# Altium PCB DB30.PcbDoc (part 2 of 8)
Units mil, origin at the board's own origin, x right, y up, seen from the top; angles counter-clockwise.
Board outline 3236.22 x 4456.69 mil, 8 copper layers (Top Layer, MidLayer1, MidLayer2, GND-Layer5, MidLayer3, VCC, MidLayer4, Bottom Layer), stack 61.8 mil thick; 219 components, 472 nets, 1811 pads, 1561 vias.
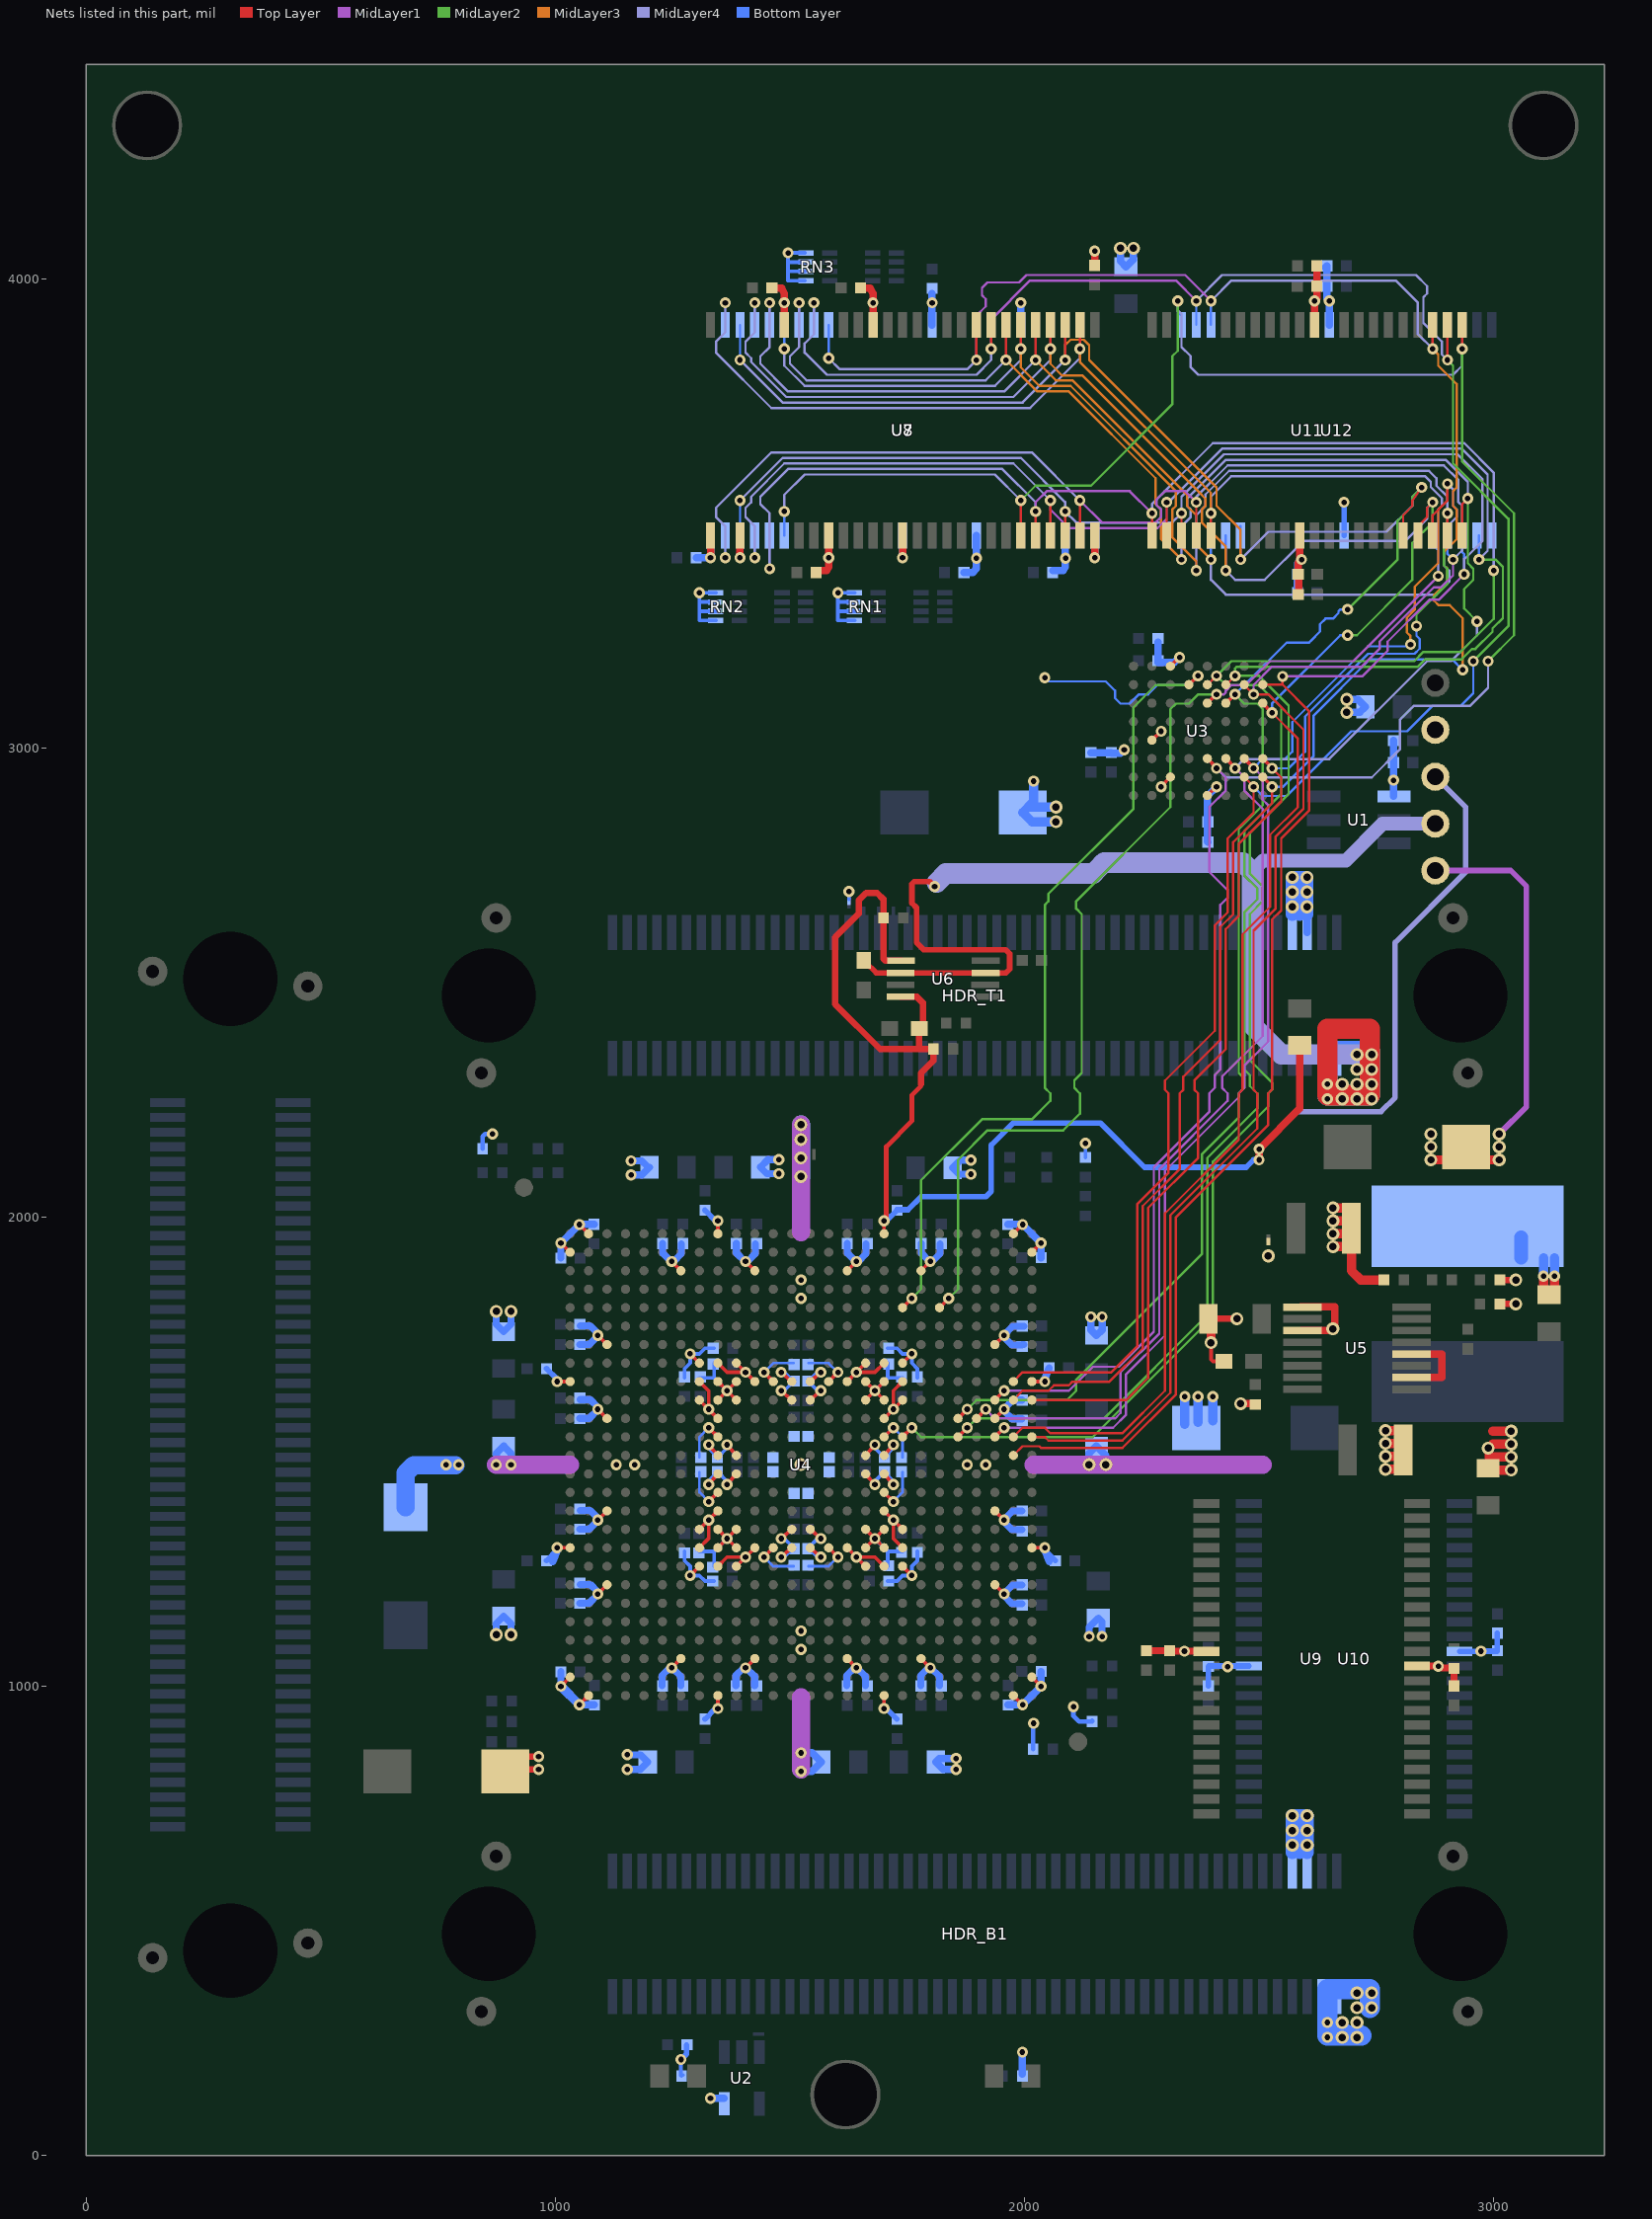
[diagram p8: the nets of this part, all layers, seen from the top]

## Part data
"Altium Logo Bot1" "Altium Logo Top1": library part D-000-0003, "Altium Logo for PCB"
C1 C7 C8 C9 C10 C11 C12 C13 C14 C26 C27 C28 C29 C30 C50 C51 C52 C53 C54 C55 C56 C57 C58 C59 C60 C61 C62 C63 C64 C65 C108 C109 C110 C114 C128 C129 C130 C131 C136 C137 C140 C141 C144 C145 C146 C147: library part D-101-0080, "Capacitor, Ceramic, 0.1uF 10% 16V 0402 (1005) X7R"
C2 C15 C16 C17 C18 C19 C20 C21 C22 C31 C32 C33 C34 C35 C36 C37 C38 C39 C40 C41 C66 C67 C68 C69 C70 C71 C72 C73 C74 C75 C76 C77 C78 C79 C80 C81 C82 C83 C84 C85 C86 C87 C88 C89 C90 C91 C92 C93 C94 C95 C96 C97 C98 C99 C100 C101 C102 C103 C104 C105 C111 C112 C113 C132 C133 C134 C135 C138 C139 C142 C143 C148 C149 C150 C151: library part D-101-0077, "Capacitor, Ceramic, 10nF 10% 16V 0402 (1005) X7R"
C3 C23 C106 C107 C119: library part D-101-0088, "Capacitor, Tantalum, 220uF 10% 10V MCCT-D (7343-31)"
C4 C5 C6 C24 C25 C42 C43 C44 C45 C46 C47 C48 C49 C115 C116 C120 C122: library part D-101-0087, "Capacitor, Ceramic, 10uF 10% 10V 0805 (2012) X5R"
C117: library part D-101-0069, "Capacitor, Ceramic, 470pF 5% 50V 0402 (1005) COG"
C118 C125 C126: library part D-101-0095, "Capacitor, Ceramic, 2.2uF 10% 10V 0603 (1608) X5R"
C121 C123: library part D-101-0021, "Capacitor, Ceramic, 22uF -20%/+80% 10V 1210 (3225) Y5V"
C124: library part D-101-0027, "Capacitor, Ceramic, 1uF 10% 25V 1206 (3216) X7R"
C127: library part D-101-0105, "Capacitor, Ceramic, 0.033uF 10% 10V 0402 (1005) X7R"
HDR_B1 HDR_L1 HDR_T1: library part D-300-0025, "Connector, Molex Docking Station 100 Pin Male 54075"
L1: library part D-102-0004, "Inductor, 2.2uH, 15A, 4R2, SMD"
LED1: library part D-153-0004, "LED, Green 0805 (2012) KP-2012SGD"
LED2: library part D-153-0003, "LED, Red 0805 (2013) HSMH-C170"
MH1 MH2 MH3: library part D-001-0001, "Mounting Hole, M3 Screw, Plated, Square Pad"
NT1 NT2 NT3 NT4 NT5 NT6 NT7 NT8: library part D-002-0002, "Net-Tie, Surface Mount, 2 x 0.4mm x 0.2mm SMT Pads - For 0.2mm Track"
R1 R2: library part D-100-0111, "Resistor, 270R 1% 0402 (1005)"
R3 R5 R9 R12: library part D-100-0088, "Resistor, 4K7 1% 0402 (1005)"
R4 R6 R7 R8 R10 R11 R13 R14 R15 R16 R17: library part D-100-0131, "Resistor, 100R 1% 0402 (1005)"
R18 R23 R24 R25: library part D-100-0132, "Resistor, 100K 1% 0402 (1005)"
R19: library part D-100-0128, "Resistor, 10R 1% 0402 (1005)"
R20 R22: library part D-100-0105, "Resistor, 2K7 1% 0402 (1005)"
R21: library part D-100-0109, "Resistor, 27K 1% 0402 (1005)"
RN1 RN2 RN3 RN4 RN5 RN6: library part D-104-0001, "Resistor Network, Isolated, 4 x 100R, 5%, SMD 0402 x 4"
TP1 TP2 TP3 TP4 TP5: library part D-006-0000, "Test Point, PCB Mount with Silkscreen Box"
U1: library part D-263-0002, "Dual Addressable Switch Plus 1KB Memory"
U2: library part D-205-0001, "SN74LVC1G04DBV, Single Inverter Gate, 1.65-V to 5.5-V"
U3: library part D-262-0001, "S29GL256N11FFIV10, 256 Megabit (16M x 16) 3.0V Page Mode Flash Memory"
U4: library part D-241-0001, "FPGA, Xilinx Spartan3-1500 FG676 Speed=4"
U5: library part D-204-0002, "MAX1831EEE, 3A, 1MHz, Low-Voltage, Step-Down Regulators with Synchronous Rectification and Internal Switches"
U6: library part D-204-0016, "MAX8860EUA18+, 1.8V Linear Regulator with adjustable Output, Low-noise, Low-dropout, 300mA, uMAX"
U7 U8: library part D-261-0000, "MT48LC16M16A2TG, 256 Mbit High-Speed CMOS SDRAM, 16Mb x 16Bit x 4 Banks, TSOP54"
U9 U10 U11 U12: library part D-260-0000, "K6R4016V1D-TC10T, 256K x 16-Bit SRAM, TSOP44"

## Via types
v1: diameter 23.62, hole 11.81, Top Layer to Bottom Layer, 944 vias
v2: diameter 23.62, hole 11.81, Top Layer to Bottom Layer, tented both sides, 477 vias
v3: diameter 27.56, hole 15.75, Top Layer to Bottom Layer, 139 vias
v4: diameter 23.62, hole 11.81, Top Layer to Bottom Layer, tented top, 1 vias

## Nets (pads, with @x,y where several pads share a name; then routed paths per layer and width w, separated by ;. In a path a pad name is that pad's centre, name@x,y a point inside that pad or via, vN(x,y) a via of type N, cw(c..) or ccw(c..) an arc to the next point about the centre after c; other vN are vias at no path point)
1V2: C3.1 C4.1 C5.1 C6.1 C7.1 C8.1 C9.1 C10.1 C11.1 C12.1 C13.1 C14.1 C15.1 C16.1 C17.1 C18.1 C19.1 C20.1 C21.1 C22.1 C119.1 C122.1 C123.1 L1.2 R20.1 TP5.1 U4.H8 U4.H19 U4.J9 U4.J10 U4.J17 U4.J18 U4.K9 U4.K10 U4.K17 U4.K18 U4.U9 U4.U10 U4.U17 U4.U18 U4.V9 U4.V10 U4.V17 U4.V18 U4.W8 U4.W19 | length 4494.8
  Top Layer w7.87: v1(1287.4,1236.22) U4.W8@1307.09,1255.91 ; v1(1287.4,1708.66) U4.H8@1307.09,1688.98 ; U4.V9@1346.46,1295.28 v1(1366.14,1314.96) ; U4.U9@1346.46,1334.65 v1(1366.14,1314.96) ; U4.K9@1346.46,1610.24 v1(1366.14,1629.92) ; U4.J9@1346.46,1649.61 v1(1366.14,1629.92) ; U4.V10@1385.83,1295.28 v1(1366.14,1314.96) ; U4.U10@1385.83,1334.65 v1(1366.14,1314.96) ; U4.K10@1385.83,1610.24 v1(1366.14,1629.92) ; U4.J10@1385.83,1649.61 v1(1366.14,1629.92) ; U4.V17@1661.42,1295.28 v1(1681.1,1314.96) ; U4.U17@1661.42,1334.65 v1(1681.1,1314.96) ; U4.K17@1661.42,1610.24 v1(1681.1,1629.92) ; U4.J17@1661.42,1649.61 v1(1681.1,1629.92) ; U4.V18@1700.79,1295.28 v1(1681.1,1314.96) ; U4.U18@1700.79,1334.65 v1(1681.1,1314.96) ; U4.K18@1700.79,1610.24 v1(1681.1,1629.92) ; U4.J18@1700.79,1649.61 v1(1681.1,1629.92) ; U4.W19@1740.16,1255.91 v1(1759.84,1236.22) ; U4.H19@1740.16,1688.98 v1(1759.84,1708.66)
  Top Layer w19.68: C123.1@2694.88,1974.41 2692.91,1976.37 C123.1@2704.72,1988.19 ; C123.1@2696.85,1948.82 2696.85,1976.37 2696.85,1885.83 2716.54,1866.14 R20.1@2766.21,1866.14 ; v3(2866.14,2122.05) C119.1@2913.39,2122.05 ; C119.1@2941.3,2122.05 v3(3011.81,2122.05) ; C119.1@2941.3,2149.61 C119.1@2941.02,2149.33 C119.1@2968.3,2122.05 ; C122.1@3106.3,1834.65 v1(3106.3,1874.02) ; C122.1@3129.92,1834.65 v1(3129.92,1874.02)
  Top Layer w20: v3(2657.47,1937) C123.1@2696.85,1937 ; v3(2657.47,1964.56) C123.1@2696.85,1964.56 ; v3(2657.47,1992.12) C123.1@2696.85,1992.12 ; v3(2657.47,2019.68) C123.1@2696.85,2019.68
  MidLayer1 w12: TP5.1@2875.71,2738.67 3036.33,2738.67 3070,2705 3070,2235.35 v3(3011.81,2177.17)
  MidLayer1 w39.37: v1(874.02,1472.44) 1031.5,1472.44 ; v1@1523.62,822.83 1523.62,976.38 ; 1523.62,1968.5 v3(1523.62,2196.85) ; 2019.68,1472.44 v3(2137.8,1472.44) 2507.87,1472.44
  Bottom Layer w7.87: C19.1@1275.59,1287.4 1275.59,1267.72 1287.4,1255.91 v1(1287.4,1236.22) 1307.09,1236.22 1318.9,1224.41 C20.1@1338.58,1224.41 ; C13.1@1275.59,1657.48 1275.59,1677.17 1287.4,1688.98 v1(1287.4,1708.66) 1307.09,1708.66 1318.9,1720.47 C18.1@1338.58,1720.47 ; C11.1@1307.08,1287.4 1338.58,1287.4 ; C22.1@1307.09,1657.48 1338.58,1657.48 ; C9.1@1338.58,1255.9 1338.58,1287.4 ; C14.1@1338.58,1688.98 1338.58,1657.48 ; v1(1366.14,1314.96) 1338.58,1287.4 ; v1(1366.14,1629.92) 1338.58,1657.48 ; v1(1681.1,1314.96) 1708.66,1287.4 ; v1(1681.1,1629.92) 1708.66,1657.48 ; C15.1@1708.66,1224.41 1728.35,1224.41 1740.16,1236.22 v1(1759.84,1236.22) 1759.84,1255.9 1771.65,1267.72 C8.1@1771.65,1287.4 ; C7.1@1708.66,1255.9 1708.66,1287.4 ; C12.1@1708.66,1688.98 1708.66,1657.48 ; C21.1@1708.66,1720.47 1728.35,1720.47 1740.16,1708.66 v1(1759.84,1708.66) 1759.84,1688.98 1771.65,1677.17 C10.1@1771.65,1657.48 ; C16.1@1740.16,1287.4 1708.66,1287.4 ; C17.1@1740.16,1657.48 1708.66,1657.48
  Bottom Layer w15.75: v1(874.02,1472.44) 874.02,1496.06 C4.1@889.76,1511.81 905.51,1496.06 v1(905.51,1472.44) ; v1(1523.62,818.9) 1547.24,818.9 C5.1@1566.93,838.58 1547.24,858.27 v1(1523.62,858.27) ; v3(2137.8,1472.44) 2137.8,1496.06 C6.1@2153.54,1511.81 2173.23,1492.12 v3(2173.23,1472.44)
  Bottom Layer w19.68: v1(3106.3,1874.02) L1.2@3106.3,1913.39 ; v1(3129.92,1874.02) L1.2@3129.92,1913.39
  Bottom Layer w20: C3.1@2341.79,1558.51 v1(2341.79,1617.56) ; C3.1@2370.08,1562.45 v1(2370.08,1617.56) ; C3.1@2401.58,1566.38 v1(2401.58,1617.56)
  Bottom Layer w29.53: L1.2@3059.06,1913.38 L1.2@3059.06,1956.69
  Bottom Layer w39.37: v3(1523.62,2086.61) v3(1523.62,2196.85)
  other v1: 1523.62,1078.74 1523.62,1118.11 1129.92,1472.44 1169.29,1472.44 1877.95,1472.44 1917.32,1472.44 1523.62,1826.77 1523.62,1866.14
  other v3: 1523.62,2125.98 2866.14,2149.61 3011.81,2149.61 1523.62,2165.35 2866.14,2177.17
2V5: C23.1 C24.1 C25.1 C26.1 C27.1 C28.1 C29.1 C30.1 C31.1 C32.1 C33.1 C34.1 C35.1 C36.1 C37.1 C38.1 C39.1 C40.1 C41.1 C125.1 R18.2 R24.1 TP3.1 U4.A2 U4.A9 U4.A18 U4.A25 U4.AE1 U4.AE26 U4.AF2 U4.AF9 U4.AF18 U4.AF25 U4.B1 U4.B26 U4.J1 U4.J26 U4.V1 U4.V26 U6.1 U6.4 | length 5138.7
  Top Layer w5: 1779.53,2279.53 1779.53,2283.46
  Top Layer w7.87: v1(1003.94,1295.28) U4.V1@1031.5,1295.28 ; v1(1003.94,1649.61) U4.J1@1031.5,1649.61 ; v1(1011.81,1000) U4.AE1@1031.5,1019.68 ; v1(1011.81,1944.88) U4.B1@1031.5,1925.2 ; v1(1051.18,960.63) U4.AF2@1070.87,980.31 ; v1(1051.18,1984.25) U4.A2@1070.87,1964.57 ; v1(1346.46,952.76) U4.AF9@1346.46,980.31 ; U4.A9@1346.46,1964.57 v1(1346.46,1992.13) ; v1(1700.79,952.76) U4.AF18@1700.79,980.31 ; U4.A18@1700.79,1964.57 v1(1700.79,1992.13) ; U4.AF25@1976.38,980.31 v1(1996.06,960.63) ; U4.A25@1976.38,1964.57 v1(1996.06,1984.25) ; U4.AE26@2015.75,1019.68 v1(2035.43,1000) ; U4.V26@2015.75,1295.28 v1(2043.31,1295.28) ; U4.J26@2015.75,1649.61 v1(2043.31,1649.61) ; U4.B26@2015.75,1925.2 v1(2035.43,1944.88)
  Top Layer w10: v1(1700.79,1992.13) 1705.41,1996.75 1705.41,2150.3 1759.84,2204.72 1759.84,2236.22 1759.84,2259.84 1779.53,2279.53
  Top Layer w13.78: C23.1@893.78,818.62 925.55,850.39 v1(964.57,850.39) ; C23.1@897.99,822.83 v1(964.57,822.83) ; U6.4@1736.22,2469.48 1770.67,2469.48 1783.46,2456.69 1783.46,2413.39 C125.1@1775.59,2405.51 ; U6.1@1737.2,2546.25 1703.75,2546.25 1699.29,2550.71 R24.1@1699.29,2637.79 1699.29,2677.68 1686.02,2690.94 1662.4,2690.94 1646.65,2675.2 1646.65,2646.65 1596.46,2596.46 1596.46,2453.74 1691.93,2358.26 R18.2@1805.59,2358.26 ; 1775.59,2358.27 C125.1@1775.59,2401.57 ; 1779.53,2283.46 1779.53,2307.09 1795.28,2322.83 1805.59,2333.15 R18.2@1805.59,2354.33
  Top Layer w15.75: v1@2500,2125.97 v1(2500,2145) 2586.61,2231.61 2586.61,2267.72 C24.1@2586.61,2366.14
  MidLayer4 w11.81: v1(2500,2122.05) v1(2500,2145) 2580,2225 2760,2225 2790,2255 2790,2585 2940,2735 2940,2874.37 TP3.1@2875.71,2938.67
  Bottom Layer w7.87: v1@1341.53,1992.13 v1(1346.46,1992.13)
  Bottom Layer w11.81: C28.1@981.3,1267.71 1003.94,1290.35 v1(1003.94,1295.28) ; C32.1@981.3,1677.16 1003.94,1654.52 v1(1003.94,1649.61) ; C40.1@1318.89,930.12 1341.53,952.76 v1(1346.46,952.76) ; C29.1@1318.89,2014.76 v1@1341.53,1992.13 ; v1(1700.79,952.76) 1705.7,952.76 C30.1@1728.34,930.12 ; v1(1700.79,1992.13) 1705.71,1992.13 C26.1@1728.34,2014.76 ; C26.1@1728.34,2015.74 1751.97,2015.74 1779.52,2043.3 1917.32,2043.3 1929.13,2055.11 1929.13,2153.54 1976.37,2200.78 2161.41,2200.78 2255.9,2106.29 2472.44,2106.29 2488.18,2122.04 v1(2500,2122.05) ; v1(2043.31,1295.28) 2043.31,1290.35 C39.1@2065.94,1267.71
  Bottom Layer w15.75: 994.63,1266.18 v1@1003.94,1290.35 ; v1(1011.81,1000) 1011.81,1030.92 C35.1@1011.81,1031.49 ; C41.1@1011.81,1913.39 v1(1011.81,1944.88) v1(1051.18,1984.25) 1082.1,1984.25 C33.1@1082.68,1984.25 ; v1(1051.18,960.63) C38.1@1082.68,960.63 ; v1(1476.26,2092.6) 1450.71,2092.6 C25.1@1437.01,2106.29 1453.31,2122.6 v1(1476.26,2122.6) ; C31.1@1964.57,960.63 1965.14,960.63 v1(1996.06,960.63) v1(2035.43,1000) C36.1@2035.43,1031.5 ; C34.1@1964.57,1984.25 v1(1996.06,1984.25) v1(2035.43,1944.88) 2035.43,1913.96 C37.1@2035.43,1913.39 ; v1@2042.32,1650.59 v1(2043.31,1649.61) 2043.31,1654.53 C27.1@2052.62,1678.7 ; v1@2043.31,1290.35 2052.62,1266.18
  Bottom Layer w19.68: v1(1011.81,1000) v1(1051.18,960.63)
3V3: C1.2 C2.1 C42.1 C43.1 C44.1 C45.1 C46.1 C47.1 C48.1 C49.1 C50.1 C51.1 C52.1 C53.1 C54.1 C55.1 C56.1 C57.1 C58.1 C59.1 C60.1 C61.1 C62.1 C63.1 C64.1 C65.1 C66.1 C67.1 C68.1 C69.1 C70.1 C71.1 C72.1 C73.1 C74.1 C75.1 C76.1 C77.1 C78.1 C79.1 C80.1 C81.1 C82.1 C83.1 C84.1 C85.1 C86.1 C87.1 C88.1 C89.1 C90.1 C91.1 C92.1 C93.1 C94.1 C95.1 C96.1 C97.1 C98.1 C99.1 C100.1 C101.1 C102.1 C103.1 C104.1 C105.1 C106.1 C107.1 C108.2 C109.1 C110.1 C111.1 C112.1 C113.1 C114.1 C115.1 C116.1 C128.1 C129.1 C130.1 C131.1 C132.1 C133.1 C134.1 C135.1 C136.1 C137.1 C138.1 C139.1 C140.1 C141.1 C142.1 C143.1 C144.1 C145.1 C146.1 C147.1 C148.1 C149.1 C150.1 C151.1 HDR_B1.94 HDR_B1.96 HDR_T1.94 HDR_T1.96 NT1.2 R1.1 R2.1 R3.2 R5.2 R9.2 R12.2 RN1.1 RN1.2 RN1.3 RN1.4 RN2.1 RN2.2 RN2.3 RN2.4 RN3.1 RN3.2 RN3.3 RN3.4 TP2.1 U1.4 U2.5 U3.D8 U3.F1 U3.F7 U3.G5 U4.AD7 U4.AD11 U4.AD16 U4.AD20 U4.C7 U4.C11 U4.C16 U4.C20 U4.G3 U4.G24 U4.H9 U4.H10 U4.H17 U4.H18 U4.J8 U4.J11 U4.J12 U4.J13 U4.J14 U4.J15 U4.J16 U4.J19 U4.K8 U4.K13 U4.K14 U4.K19 U4.L3 U4.L9 U4.L18 U4.L24 U4.M9 U4.M18 U4.N9 U4.N10 U4.N17 U4.N18 U4.P9 U4.P10 U4.P17 U4.P18 U4.R9 U4.R18 U4.T3 U4.T9 U4.T18 U4.T24 U4.U8 U4.U13 U4.U14 U4.U19 U4.V8 U4.V11 U4.V12 U4.V13 U4.V14 U4.V15 U4.V16 U4.V19 U4.W9 U4.W10 U4.W17 U4.W18 U4.Y3 U4.Y24 U7.1 U7.3 U7.9 U7.14 U7.27 U7.43 U7.49 U8.1 U8.3 U8.9 U8.14 U8.27 U8.43 U8.49 U9.11 U9.33 U10.11 U10.33 U11.11 U11.33 U12.11 U12.33 | length 10233.3
  Top Layer w5: U7.9@1582.68,3433.07 U7.9@1582.68,3452.76
  Top Layer w7.87: v1(1090.55,1196.85) U4.Y3@1110.24,1216.54 ; v1(1090.55,1354.33) U4.T3@1110.24,1374.02 ; v1(1090.55,1590.55) U4.L3@1110.24,1570.87 ; v1(1090.55,1748.03) U4.G3@1110.24,1728.35 ; v1(1248.03,1039.37) U4.AD7@1267.72,1059.05 ; v1(1248.03,1905.51) U4.C7@1267.72,1885.83 ; U4.V8@1307.09,1295.28 1326.77,1314.96 v1(1326.77,1354.33) ; U4.U8@1307.09,1334.65 v1(1326.77,1354.33) ; U4.K8@1307.09,1610.24 v1(1326.77,1590.55) ; U4.J8@1307.09,1649.61 1326.77,1629.92 v1(1326.77,1590.55) ; v1(1326.77,1393.7) U4.R9@1346.46,1413.39 ; v1(1326.77,1430.12) U4.P9@1346.46,1452.76 ; v1(1326.77,1514.76) U4.N9@1346.46,1492.13 ; v1(1326.77,1551.18) U4.M9@1346.46,1531.5 ; U4.W9@1346.46,1255.91 1366.14,1275.59 v1(1405.51,1275.59) ; U4.T9@1346.46,1374.02 v1(1326.77,1354.33) ; U4.L9@1346.46,1570.87 v1(1326.77,1590.55) ; U4.H9@1346.46,1688.98 1366.14,1669.29 v1(1405.51,1669.29) ; v1(1366.14,1430.12) U4.P10@1385.83,1452.76 ; v1(1366.14,1514.76) U4.N10@1385.83,1492.13 ; U4.W10@1385.83,1255.91 v1(1405.51,1275.59) ; U4.H10@1385.83,1688.98 v1(1405.51,1669.29) ; v1(1405.51,1039.37) U4.AD11@1425.2,1059.05 ; v1(1405.51,1905.51) U4.C11@1425.2,1885.83 ; U4.V11@1425.2,1295.28 v1(1405.51,1275.59) ; U4.J11@1425.2,1649.61 v1(1405.51,1669.29) ; v1(1444.88,1275.59) U4.V12@1464.57,1295.28 ; v1(1444.88,1669.29) U4.J12@1464.57,1649.61 ; v1(1481.3,1275.59) U4.V13@1503.94,1295.28 ; v1(1481.3,1314.96) U4.U13@1503.94,1334.65 ; v1(1481.3,1629.92) U4.K13@1503.94,1610.24 ; v1(1481.3,1669.29) U4.J13@1503.94,1649.61 ; U4.V14@1543.31,1295.28 v1(1565.94,1275.59) ; U4.U14@1543.31,1334.65 v1(1565.95,1314.96) ; U4.K14@1543.31,1610.24 v1(1565.95,1629.92) ; U4.J14@1543.31,1649.61 v1(1565.94,1669.29) ; U4.V15@1582.68,1295.28 v1(1602.36,1275.59) ; U4.J15@1582.68,1649.61 v1(1602.36,1669.29) ; U4.AD16@1622.05,1059.05 v1(1641.73,1039.37) ; U4.V16@1622.05,1295.28 v1(1641.73,1275.59) ; U4.J16@1622.05,1649.61 v1(1641.73,1669.29) ; U4.C16@1622.05,1885.83 v1(1641.73,1905.51) ; U4.W17@1661.42,1255.91 v1(1641.73,1275.59) ; U4.P17@1661.42,1452.76 v1(1681.1,1430.12) ; U4.N17@1661.42,1492.13 v1(1681.1,1514.76) ; U4.H17@1661.42,1688.98 v1(1641.73,1669.29) ; U4.W18@1700.79,1255.91 1681.1,1275.59 v1(1641.73,1275.59) ; U4.T18@1700.79,1374.02 v1(1720.47,1354.33) ; U4.R18@1700.79,1413.39 v1(1720.47,1393.7) ; U4.P18@1700.79,1452.76 v1(1720.47,1430.12) ; U4.N18@1700.79,1492.13 v1(1720.47,1514.76) ; U4.M18@1700.79,1531.5 v1(1720.47,1551.18) ; U4.L18@1700.79,1570.87 v1(1720.47,1590.55) ; U4.H18@1700.79,1688.98 1681.1,1669.29 v1(1641.73,1669.29) ; U4.V19@1740.16,1295.28 1720.47,1314.96 v1(1720.47,1354.33) ; U4.U19@1740.16,1334.65 v1(1720.47,1354.33) ; U4.K19@1740.16,1610.24 v1(1720.47,1590.55) ; U4.J19@1740.16,1649.61 1720.47,1629.92 v1(1720.47,1590.55) ; U4.AD20@1779.53,1059.05 v1(1799.21,1039.37) ; U4.C20@1779.53,1885.83 v1(1799.21,1905.51) ; U4.Y24@1937.01,1216.54 v1(1956.69,1196.85) ; U4.T24@1937.01,1374.02 v1(1956.69,1354.33) ; U4.L24@1937.01,1570.87 v1(1956.69,1590.55) ; U4.G24@1937.01,1728.35 v1(1956.69,1748.03) ; U3.G5@2271.65,3016.73 v1(2291.34,3035.43) ; v1@2291.34,2918.31 U3.F7@2311.02,2937.99 ; U3.F1@2311.02,3174.21 v1@2330.71,3193.9 ; U3.D8@2389.76,2898.62 v1@2409.45,2918.31
  Top Layer w15: C139.1@2259.84,1075.78 C137.1@2309.14,1075.78 2309.92,1075 2343,1075 2343.2,1074.8 U9.33@2387.89,1074.8 ; U9.11@2836.71,1043.3 2885.83,1043.3 2889.76,1039.37 2914.45,1039.37 C136.1@2915.44,1038.38 C138.1@2915.44,1000.97 ; v1@2881.7,1043.3 v1(2882,1043)
  Top Layer w15.75: v2@1330.71,3409.45 U7.1@1330.71,3452.76 ; v2(1393.7,3405.51) U7.3@1393.7,3452.76 ; C132.1@1461.61,3980.31 1482.28,3980.32 1488.19,3968.51 ; U7.49@1488.19,3901.57 v2(1488.19,3948.82) ; v2@1488.19,3944.88 1488.19,3964.57 ; C129.1@1556.1,3377.95 1578.74,3377.95 1582.68,3385.83 1582.68,3389.76 1583.46,3401.52 1583.58,3403.35 v2@1583.66,3404.53 ; U7.9@1582.68,3452.76 v2@1582.68,3409.45 ; C133.1@1650.59,3980.31 1671.26,3980.32 1677.17,3968.51 v2@1677.17,3944.88 ; U7.43@1677.17,3901.57 v2(1677.17,3948.82) ; v2(1740.16,3405.51) U7.14@1740.16,3452.76 ; v2(2149.6,3405.52) U7.27@2149.61,3452.76 ; C128.1@2149.6,4028.54 v2(2149.61,4059.06) ; C148.1@2582.4,3371.05 C148.1@2583.38,3370.07 2583.38,3394.4 v2(2590.55,3401.57) 2586.61,3405.51 U11.11@2586.61,3452.76 ; C144.1@2584.37,3329.71 2584.37,3370.07 C148.1@2584.34,3370.23 ; U11.33@2618.11,3901.57 v2(2618.11,3952.76) 2623.03,3957.67 C145.1@2623.03,4027.55 ; v2@1582.68,3409.45 v2@1583.43,3405.66 ; v2@1582.68,3409.45 v2@1583.43,3405.66 ; v2@1583.43,3405.66 v2@1583.66,3404.53 ; v2@1583.43,3405.66 v2@1583.66,3404.53
  MidLayer4 w5: v3(2570.87,661.42) v3@2570.87,665.36
  Bottom Layer w5.51: C81.1@1307.09,1456.69 1307.09,1413.39 v1(1326.77,1393.7) ; C79.1@1307.09,1488.19 1307.09,1531.5 v1(1326.77,1551.18) ; v1(1444.88,1275.59) 1464.57,1255.91 C86.1@1507.87,1255.91 ; v1(1444.88,1669.29) 1464.57,1688.98 C80.1@1507.87,1688.98 ; C87.1@1539.37,1255.91 1582.68,1255.91 v1(1602.36,1275.59) ; C97.1@1539.37,1688.98 1582.68,1688.98 v1(1602.36,1669.29) ; v1(1720.47,1393.7) 1740.16,1413.39 C76.1@1740.16,1456.69 ; v1(1720.47,1551.18) 1740.16,1531.5 C96.1@1740.16,1488.19
  Bottom Layer w7.87: v1@865.98,2177.17 v1@865.98,2178 ; v1(1267.72,204.72) 1267.72,170.78 R1.1@1269.21,169.29 R1.1@1271.65,171.73 ; C108.2@1279.53,235.24 C108.2@1280.51,236.22 ; 1307.09,3291.34 RN2.2@1342.51,3291.34 ; 1307.09,3311.02 RN2.3@1342.51,3311.02 ; v1(1326.77,1430.12) 1326.77,1437.01 1346.46,1456.69 1366.14,1437.01 v1(1366.14,1430.12) ; v1@1326.77,1511.81 1326.77,1507.87 1346.46,1488.19 1366.14,1507.87 v1(1366.14,1514.76) ; RN2.1@1342.51,3271.65 1307.09,3271.65 v1(1307.09,3330.71) RN2.4@1342.51,3330.71 ; U2.5@1359.25,122.05 U2.5@1360.23,123.03 ; v1(1481.3,1275.59) 1488.19,1275.59 1507.38,1294.78 1507.87,1295.28 1488.19,1314.96 v1(1481.3,1314.96) ; v1(1481.3,1629.92) 1488.19,1629.92 1507.87,1649.61 1488.19,1669.29 v1(1481.3,1669.29) ; 1496.07,4015.74 RN3.2@1531.49,4015.74 ; 1496.07,4035.43 RN3.3@1531.49,4035.43 ; RN3.1@1531.49,3996.06 1496.07,3996.06 v1(1496.07,4055.11) RN3.4@1531.49,4055.11 ; v1@1559.06,1275.59 1539.86,1294.78 1539.37,1295.28 1559.05,1314.96 v1(1565.95,1314.96) ; v1(1565.95,1629.92) 1559.05,1629.92 1539.37,1649.61 1559.06,1669.29 v1(1565.94,1669.29) ; 1602.36,3291.34 RN1.2@1637.79,3291.34 ; 1602.36,3311.02 RN1.3@1637.79,3311.02 ; NT1.2@1625.98,2677.17 v2@1625.98,2688.98 ; RN1.1@1637.79,3271.65 1602.36,3271.65 v1(1602.36,3330.71) RN1.4@1637.79,3330.71 ; v1(1681.1,1430.12) 1681.1,1437.01 1700.79,1456.69 1703.09,1454.39 1720.47,1437.01 v1(1720.47,1430.12) ; v1(1681.1,1514.76) 1681.1,1507.87 1700.79,1488.19 1703.09,1490.49 1720.47,1507.87 v1(1720.47,1514.76) ; v1(1854.33,846.46) v1@1854.33,854.33 ; R5.2@2129.92,2127.48 v1(2129.92,2157.48) v1@2129.92,2161.42
  Bottom Layer w9.84: R3.2@844.96,2145.66 844.96,2171.73 850.39,2177.17 v1@865.98,2177.17 ; R9.2@2018.18,866.14 2018.18,915.82 v1(2019.68,921.26) ; v1(2104.33,956.69) 2104.33,937.01 2116.14,925.2 R12.2@2144.17,925.2 R12.2@2144.17,926.69
  Bottom Layer w11.81: v1(1267.72,204.72) 1279.53,216.54 C108.2@1279.53,235.24 ; C140.1@2391.82,1000.97 C142.1@2391.82,1042.31 2392.81,1043.3 U10.11@2478.44,1043.3 ; v1(2433,1042) v1@2434.3,1043.3 ; U12.11@2681.1,3452.76 v2(2681.1,3523.62) ; U10.33@2927.25,1074.79 2972.79,1074.79 v1(2973,1075) 3007.08,1075 C143.1@3007.87,1075.79 C141.1@3007.87,1113.19
  Bottom Layer w15: v3(874.02,1110.24) 874.02,1133.86 C45.1@889.76,1149.6 905.51,1133.85 v3(905.51,1110.24) ; v3(874.02,1799.21) 874.02,1771.65 C43.1@889.76,1755.9 905.51,1771.65 v3(905.51,1799.21) ; C84.1@1052.4,1177.16 1052.4,1177.4 1072.24,1177.4 v1@1090.55,1195.71 ; C53.1@1052.4,1334.88 1072.24,1334.88 v1@1090.55,1353.19 ; C58.1@1052.4,1571.1 1072.24,1571.1 v1@1090.55,1589.41 ; C61.1@1052.4,1728.58 1072.24,1728.58 v1@1090.55,1746.89 ; C56.1@1053.04,1217.4 1074.24,1217.4 1090.55,1201.1 v1(1090.55,1196.85) ; C101.1@1053.04,1374.88 1074.24,1374.88 1090.55,1358.58 v1(1090.55,1354.33) ; C102.1@1053.04,1611.1 1074.24,1611.1 1090.55,1594.8 v1(1090.55,1590.55) ; C104.1@1053.04,1768.58 1074.24,1768.58 1090.55,1752.28 v1(1090.55,1748.03) ; v2(1153.54,822.83) 1181.1,822.83 C49.1@1196.85,838.58 1181.1,854.33 v2(1153.54,854.33) ; v1(1161.54,2090) 1184.49,2090 C42.1@1200.78,2106.29 ; v1(1161.54,2120) 1184,2120 C42.1@1197,2107 ; C62.1@1227.48,1001.86 1227.48,1023.06 1243.78,1039.37 v1(1248.03,1039.37) ; C59.1@1228.58,1943.66 1228.58,1923.82 v1@1246.89,1905.51 ; v1(1248.03,1905.51) 1252.28,1905.51 1268.58,1921.82 C70.1@1268.58,1943.03 ; v1@1249.17,1039.37 1267.48,1021.06 C85.1@1267.48,1001.22 ; C83.1@1384.96,1001.86 1384.96,1023.06 1401.26,1039.37 v1(1405.51,1039.37) ; C100.1@1386.06,1943.66 1386.06,1923.82 v1@1404.37,1905.51 ; v1(1405.51,1905.51) 1409.76,1905.51 1426.06,1921.82 C65.1@1426.06,1943.02 ; v1@1406.65,1039.37 1424.96,1021.06 C57.1@1424.96,1001.22 ; C52.1@1621.18,1001.86 1621.18,1023.06 1637.49,1039.37 v1(1641.73,1039.37) ; C99.1@1622.29,1943.66 1622.29,1923.82 v1@1640.59,1905.51 ; v1(1641.73,1905.51) 1645.98,1905.51 1662.29,1921.82 C64.1@1662.29,1943.02 ; v1@1642.88,1039.37 1661.18,1021.06 C91.1@1661.18,1001.22 ; C51.1@1778.66,1001.86 1778.66,1023.06 1794.97,1039.37 v1(1799.21,1039.37) ; C68.1@1779.77,1943.66 1779.77,1923.82 v1@1798.07,1905.51 ; v1(1799.21,1905.51) 1803.46,1905.51 1819.77,1921.82 C60.1@1819.77,1943.02 ; v1@1800.36,1039.37 1818.66,1021.06 C69.1@1818.66,1001.22 ; C48.1@1811.02,838.58 1826.77,822.83 v1(1854.33,822.83) ; v1(1885.83,2091.61) 1860.28,2091.6 C44.1@1846.58,2105.29 1862.88,2121.6 v1(1885.83,2121.61) ; v1(1956.69,1196.85) 1956.69,1192.6 1973,1176.3 C50.1@1994.21,1176.3 ; v1@1956.69,1197.99 1975,1216.3 C103.1@1994.84,1216.3 ; v1(1956.69,1354.33) 1956.69,1350.08 1973,1333.78 C105.1@1994.21,1333.78 ; v1@1956.69,1355.47 1975,1373.78 C55.1@1994.84,1373.78 ; v1(1956.69,1590.55) 1956.69,1586.31 1973,1570 C63.1@1994.21,1570 ; v1@1956.69,1591.69 1975,1610 C71.1@1994.84,1610 ; v1(1956.69,1748.03) 1956.69,1743.79 1973,1727.48 C54.1@1994.21,1727.48 ; v1@1956.69,1749.17 1975,1767.48 1994.84,1767.48 C89.1@1994.84,1767.71 ; C54.1@1995.07,1728.35 C54.1@1999.01,1728.35 ; C89.1@1995.07,1767.71 C89.1@1999.01,1767.72 ; v1(2137.8,1106.3) 2137.8,1125.99 C47.1@2157.48,1145.67 2165.35,1137.79 v1(2165.35,1106.3)
  Bottom Layer w15.75: C130.1@1300.19,3405.5 v2(1330.71,3405.51) ; U8.27@1329.73,3437.99 U8.27@1330.71,3437.01 ; v1(1330.71,122.05) U2.5@1359.25,122.05 ; v2@1330.71,3404.53 U8.27@1330.71,3452.76 ; v2(1740.16,3405.51) U8.14@1740.16,3452.76 ; U8.43@1803.15,3901.57 C131.1@1803.15,3968.5 ; C48.1@1811.02,838.58 1818.9,846.46 v1(1854.33,846.46) ; C135.1@1871.06,3374.01 1889.76,3374.01 1897.64,3381.89 v2(1897.64,3404.53) 1897.64,3405.51 U8.9@1897.64,3452.76 ; U8.49@1992.13,3901.57 v2(1992.13,3948.82) ; R2.1@1995.59,173.23 v1(1995.59,220.47) ; C134.1@2060.05,3377.95 2082.68,3377.95 2086.62,3385.83 2086.62,3389.76 U8.3@2086.61,3452.76 ; v2@2086.62,3409.45 v2(2087.6,3404.53) ; v4(2141.73,1787.4) 2141.73,1759.83 C46.1@2153.54,1748.03 2165.35,1759.84 v1(2165.35,1787.4) ; C114.1@2141.73,2990.16 C111.1@2185.04,2990.16 2186.02,2989.18 2204.73,2989.18 v1(2212.6,2996.06) ; v2(2149.6,3405.52) 2149.61,3409.45 U8.1@2149.61,3452.76 ; v3(2204.72,4064.96) 2204.72,4037.4 C116.1@2216.53,4025.58 2232.28,4041.34 v3(2232.28,4064.96) ; C110.1@2284.45,3225.39 2284.45,3182.09 2318.9,3182.09 v1@2330.22,3193.41 ; C109.1@2390.74,2799.21 2389.76,2800.19 2389.76,2897.64 v1@2409.45,2917.33 ; C146.1@2581.69,3330.7 C150.1@2581.69,3370.07 2582.68,3371.06 2582.68,3393.7 v2(2590.55,3401.57) ; HDR_T1.96@2602.36,2606.3 2602.36,2645.67 ; C147.1@2641.73,4024.61 C147.1@2644.68,4027.55 2644.68,3957.68 v2(2649.61,3952.76) v2@2649.61,3956.7 ; U12.33@2649.88,3901.57 v2@2649.88,3944.88 ; v3(2687.01,3075.79) 2714.58,3075.79 C115.1@2726.38,3087.59 2710.63,3103.35 v3(2687.01,3103.35) ; U1.4@2786.42,2897.63 C1.2@2786.41,3015.74
  Bottom Layer w19.68: C107.1@2007.68,2874.02 v3(2066.93,2874.02) ; v1(2019.68,2929.13) 2019.68,2886.02 C107.1@1996.14,2862.47 2016.09,2842.52 v3(2066.93,2842.52)
  Bottom Layer w27.56: 2570.87,645.67 v3(2570.87,661.42) v3(2570.87,692.91) v3(2570.87,724.41) v3(2602.37,724.41) v3(2602.37,692.91) v3(2602.37,661.42) 2602.36,645.67 ; 2570.87,2645.67 v3(2570.87,2724.41) v3(2602.36,2724.41) 2602.36,2645.67 ; 2586.62,645.67 2586.62,724.41 ; 2586.61,2645.67 2586.61,2724.41
  Bottom Layer w39.37: C106.1@681.1,1381.89 681.1,1454.1 698,1471 v1@787.32,1471
  other v1: 2341,1075 767.24,1472.44 794.02,1472.44 866.14,2177.17 2291.34,2917.32 2409.45,2917.32 2330.71,3192.91
  other v2: 1625.98,2693.9 2786.42,2931.1 1582.68,3405.51 1803.15,3948.82
  other v3: 1523.62,1472.44 2570.87,2661.42 2602.36,2661.42 2570.87,2692.91 2602.36,2692.91
5V0: C120.1 C121.1 C126.1 HDR_B1.97 HDR_B1.99 HDR_T1.97 HDR_T1.99 R19.1 TP4.1 U5.2 U5.4 U6.2 U6.7 | length 4216.9
  Top Layer w12: C126.1@1661.42,2543.31 1684.06,2520.66 1951.78,2520.66 1960.66,2520.66 1968.5,2528.5 1968.5,2537.39 1968.5,2555 1968.5,2561.5 1960,2570 1953.5,2570 1785,2570 1770,2585 1770,2659.13 ; 1760,2669.13 1770,2659.13 ; 1760,2669.13 1760,2710 1765,2715 1798.1,2715 ; 1760,2669.13 1770,2659.13 ; 1798.1,2715 v2(1808.5,2704.6) 1798.1,2715
  Top Layer w15.75: v3(2460.63,1602.36) 2490.62,1602.36 R19.1@2492.12,1600.86 ; U5.2@2824.58,1658.25 2889.67,1658.25 2889.67,1708.25 U5.4@2824.58,1708.25 ; C120.1@2988.18,1464.56 v3(2988.19,1507.87)
  Top Layer w20: v3(2769.67,1517.71) C121.1@2809.04,1517.71 ; v3(2769.67,1545.27) C121.1@2809.04,1545.27 ; v3(2769.67,1462.59) C121.1@2809.04,1462.59 ; v3(2769.67,1490.15) C121.1@2809.04,1490.15 ; C120.1@2998.04,1461.1 v3(3037.41,1461.1) ; 2998.04,1488.66 v3(3037.41,1488.66) ; v3@2998.04,1516.22 v3(3037.41,1516.22) ; 2998.04,1543.78 v3(3037.41,1543.78)
  Top Layer w43.31: v1@2645.67,2259.84 2645.67,2401.58 2736.22,2401.58 2736.22,2259.84 v1@2645.67,2259.84
  MidLayer4 w30: 2484.5,2736.3 2508.2,2760 2685,2760 2763.67,2838.67 TP4.1@2875.71,2838.67
  MidLayer4 w43.31: v2@1813.28,2713.28 1832.4,2732.4 1965.4,2732.4 2146.5,2732.4 2156.3,2742.2 2169.6,2755.5 2465.3,2755.5 2484.5,2736.3 2484.5,2409.8 2547.84,2346.46 v3(2708.66,2346.46)
  Bottom Layer w43.31: 2649.61,263.78 v3@2677.17,263.78 ; v3@2716.54,255.91 2718.5,255.91 2708.66,255.91 2677.17,255.9 2645.67,255.9 2645.67,354.33 2736.22,354.33 2736.22,346.46 v3@2736.22,314.96 ; v1@2645.67,2259.84 2645.67,2354.33 2736.22,2354.33 2736.22,2346.46 2736.22,2314.96 2736.22,2283.47 2736.22,2259.84 v1@2645.67,2259.84
  other v1: 2645.67,251.97 2645.67,283.46 2645.67,2251.97 2645.67,2283.47
  other v3: 2677.17,251.97 2708.66,251.97 2677.17,283.46 2708.66,283.46 2708.66,314.96 2740.16,314.96 2708.66,346.46 2740.16,346.46 2677.17,2251.97 2708.66,2251.97 2740.16,2251.97 2677.17,2283.47 2708.66,2283.47 2740.16,2283.47 2708.66,2314.96 2740.16,2314.96 2740.16,2346.46
AGND: C118.2 C124.1 NT8.1 R22.2 R23.2 U5.9 U5.11 | length 449.7
  Top Layer w7.87: v3(2397.64,1732.28) 2397.64,1696.85 2401.58,1692.91 C118.2@2425.19,1692.91
  Top Layer w13.78: C124.1@2391.73,1783.46 v3(2452.75,1783.46) ; R23.2@3013.3,1814.96 v3(3047.24,1814.96) ; R22.2@3013.3,1866.14 v3(3047.24,1866.14)
  Top Layer w15.75: U5.9@2589.19,1808.68 2591.08,1808.69 2592.58,1808.69 2661.35,1808.87 2661.35,1808.76 ; U5.11@2591.08,1758.25 U5.11@2592.58,1758.25 2653.67,1758.25 v3(2657.19,1761.76) ; 2657.48,1808.76 2661.35,1808.76 ; v3@2661.35,1758.26 2661.35,1761.76 2661.35,1808.76
  Top Layer w19.68: v3(2397.64,1732.28) 2397.64,1777.55 C124.1@2391.73,1783.46 C124.1@2397.64,1789.37
  other v3: 2519.68,1917.32
BUS_A1: U3.E2 U4.E19 | length 2131.4
  Top Layer w7.87: U4.E19@1740.16,1807.09 v1(1759.84,1826.77) ; U3.E2@2350.39,3134.84 v1(2370.08,3153.55)
  MidLayer2 w5: v1(1759.84,1826.77) 1779.53,1846.46 1779.53,2027.56 1779.53,2039.37 1779.53,2078.74 1909.45,2208.66 2015.75,2208.66 2055.12,2248.03 2055.12,2263.78 2043.31,2275.59 2043.31,2665.35 2051.18,2673.23 2051.18,2688.98 2232.28,2870.08 2232.28,3086.61 2279.53,3133.86 2350.39,3133.86 v1(2370.08,3153.55)
  Bottom Layer w5: v1(2043.31,3149.61) 2051.18,3141.73 2173.23,3141.73 2192.91,3122.05 2192.91,3106.3 2204.72,3094.49 2224.41,3094.49 2244.09,3114.17 2263.78,3114.17 2283.46,3133.86 2350.39,3133.86 v1(2370.08,3153.55)
BUS_A2: U3.D2 U4.M22 U7.23 U8.23 U11.1 U12.1 | length 5381.9
  Top Layer w5: U7.23@2023.62,3452.76 v2(2023.62,3503.93) ; U11.1@2271.65,3452.76 v1(2271.65,3500) ; U3.D2@2389.76,3134.84 2390.75,3134.85 v1(2409.45,3153.54)
  Top Layer w7.87: U4.M22@1858.27,1531.5 v1(1877.95,1551.18)
  MidLayer1 w5: v2(2023.62,3503.93) 2023.62,3523.62 2047.24,3547.24 2224.41,3547.24 v1(2271.65,3500)
  MidLayer2 w5: v1(1877.95,1551.18) 1897.64,1570.87 2082.68,1570.87 2090.55,1570.87 2169.29,1570.87 2389.76,1791.34 2389.76,2125.98 2496.06,2232.28 2496.06,2263.78 2480.31,2279.53 2480.31,2303.15 2468.5,2314.96 2468.5,2649.61 2496.06,2677.17 2496.06,2700.79 2468.5,2728.35 2468.5,2822.83 2547.24,2901.57 2547.24,3086.61 2500,3133.86 2429.13,3133.86 v1(2409.45,3153.54) 2440.94,3185.04 2830.71,3185.04 2850.39,3204.72 2929.72,3204.72 3000,3275 v1(3000,3377.95)
  MidLayer4 w5: v2(1456.69,3381.89) 1456.69,3500 1437.01,3519.68 1437.01,3535.43 1496.06,3594.49 1952.75,3594.49 2023.62,3523.63 v2(2023.62,3503.93) ; v1(2271.65,3500) 2271.65,3519.69 2401.57,3649.61 2937.39,3649.61 3000,3587 v1(3000,3377.95)
  Bottom Layer w5: v2(1456.69,3381.89) U8.23@1456.69,3452.76 ; v1(3000,3377.95) U12.1@3000,3452.76
BUS_A3: U3.C2 U4.M19 U7.24 U8.24 U11.2 U12.2 | length 5554.6
  Top Layer w5: U7.24@2055.12,3452.76 v2(2055.11,3527.55) ; U11.2@2303.15,3452.76 v1(2303.15,3523.62) ; U3.C2@2429.13,3134.84 2430.12,3134.85 v1(2448.82,3153.54)
  Top Layer w7.87: U4.M19@1740.16,1531.5 v1(1759.84,1551.18)
  MidLayer1 w5: v2(2055.11,3527.55) 2055.12,3507.87 2094.49,3468.5 2283.46,3468.5 2303.15,3488.19 v1(2303.15,3523.62)
  MidLayer2 w5: v1(1759.84,1551.18) 1779.53,1531.5 2082.68,1531.5 2094.49,1531.5 2145.67,1531.5 2401.57,1787.4 2401.57,2118.11 2519.68,2236.22 2519.68,2263.78 2527.56,2271.65 2527.56,2287.4 2480.31,2334.65 2480.31,2645.67 2507.87,2673.23 2507.87,2704.72 2480.31,2732.28 2480.31,2755.91 ; 2480.31,2744.09 2480.31,2818.9 2562.99,2901.57 2562.99,3090.55 2500,3153.54 v1(2448.82,3153.54) 2448.82,3169.29 2452.76,3173.23 2838.58,3173.23 2854.33,3188.98 2931.85,3188.98 2953.81,3210.94 2960.94,3210.94 2997.73,3247.73 2997.73,3254.85 3019.68,3276.81 3019.68,3385.83 3003.94,3401.57 v1(2968.5,3401.57)
  MidLayer4 w5: v2(1425.2,3405.51) 1425.2,3472.44 1405.51,3492.13 1405.51,3511.81 1417.32,3523.62 1417.32,3535.43 1488.19,3606.3 1976.37,3606.3 v2(2055.11,3527.55) ; v1(2303.15,3523.62) 2307.09,3523.62 2421.26,3637.8 2932.21,3637.79 2987,3583 2987,3420.07 v1(2968.5,3401.57)
  Bottom Layer w5: v2(1425.2,3405.51) U8.24@1425.2,3452.76 ; v1(2968.5,3401.57) U12.2@2968.5,3452.76
BUS_A4: U3.A2 U4.N25 U7.25 U8.25 U11.3 U12.3 | length 4895.1
  Top Layer w5: U4.N25@1976.38,1492.13 1996.06,1511.81 2031.5,1511.81 2035.43,1507.87 2078.74,1507.87 2094.49,1507.87 2208.66,1507.87 2322.83,1622.05 2322.83,2000 2519.68,2196.85 2519.68,2263.78 2527.56,2271.65 2527.56,2633.86 2547.24,2653.54 2547.24,2763.78 ; U7.25@2086.61,3452.76 v2(2086.61,3503.93) ; U11.3@2334.64,3452.76 v1(2334.64,3500) ; U3.A2@2507.87,3134.84 2550.19,3134.85 ; 2547.24,2748.03 2547.24,2807.09 2606.3,2866.14 2606.3,3078.74 2550.19,3134.85 ; v1(2550.19,3152.55) 2550.19,3134.85
  MidLayer1 w5: v1(2550.19,3152.55) 2719.48,3152.55 2773.86,3206.94 2773.86,3226.62 2862.94,3315.7 2882.63,3315.7 v1(2937.01,3370.08)
  MidLayer4 w5: v2(1393.7,3527.56) 1484.25,3618.11 1992.62,3618.11 2086.61,3524.12 v2(2086.61,3503.93) 2110.23,3480.32 2314.96,3480.32 v1(2334.64,3500) 2334.64,3535.43 2425.19,3625.98 2923.02,3625.98 2976,3573 2976,3441 2937.01,3402.01 v1(2937.01,3370.08)
  Bottom Layer w5: U8.25@1393.7,3452.76 v2(1393.7,3527.56) ; U12.3@2933.07,3430.12 U12.3@2937.01,3434.05 ; U12.3@2933.07,3452.76 2933.07,3417.32 2937.01,3413.39 v1(2937.01,3370.08)
BUS_A5: U3.B2 U4.M26 U7.26 U8.26 U11.4 U12.4 | length 5009.8
  Top Layer w5: U4.M26@2015.75,1531.5 2043.31,1531.5 2051.18,1523.62 2078.74,1523.62 2094.49,1523.62 2208.66,1523.62 2311.02,1625.98 2311.02,2003.94 2496.06,2188.98 2496.06,2263.78 2488.19,2271.65 2488.19,2610.24 2535.43,2657.48 2535.43,2767.72 ; U7.26@2118.11,3452.76 v2(2118.11,3527.55) ; U11.4@2366.14,3452.76 v1(2366.14,3523.62) ; U3.B2@2468.5,3134.84 2468.51,3133.86 v1(2488.19,3114.17) 2519.69,3114.17 2594.49,3039.37 2594.49,2870.08 2535.43,2811.02 2535.43,2755.91
  MidLayer1 w5: v2(2118.11,3527.55) 2165.34,3480.32 2279.53,3480.32 2291.34,3492.13 2291.34,3507.87 2281.65,3517.56 2281.65,3529.68 2299.21,3547.24 2342.52,3547.24 v1(2366.14,3523.62) ; v1(2488.19,3114.17) 2488.19,3133.86 2527.56,3173.23 2718.98,3173.23 2756.89,3211.14 2756.89,3226.38 2873.03,3342.52 2888.27,3342.52 2913.39,3367.64 v1(2913.39,3401.57)
  MidLayer4 w5: v2(1362.2,3405.51) 1362.2,3472.44 1342.52,3492.13 1342.52,3511.81 1460.63,3629.92 2015.74,3629.92 v2(2118.11,3527.55) ; v1(2366.14,3523.62) 2366.14,3535.43 2433.07,3602.36 2893.7,3602.36 2924.7,3571.36 2924.7,3524.11 2933.07,3515.75 2933.07,3421.26 v1(2913.39,3401.57)
  Bottom Layer w5: v2(1362.2,3405.51) U8.26@1362.2,3452.76 ; U12.4@2905.51,3448.82 U12.4@2901.57,3452.76 2901.57,3413.39 v1(2913.39,3401.57)
BUS_A6: U3.D3 U4.E21 U7.29 U8.29 U11.5 U12.5 | length 4758.2
  Top Layer w5: v2(2118.1,3850.39) U7.29@2118.11,3901.57 ; U11.5@2397.64,3452.76 v1(2397.64,3500)
  Top Layer w7.87: U4.E21@1818.9,1807.09 v1(1838.58,1826.77) ; U3.D3@2389.77,3095.48 v1(2409.45,3114.18)
  MidLayer1 w5: v1(2409.45,3114.18) 2425.2,3114.18 2429.13,3118.11 2429.13,3122.05 2440.94,3133.86 2472.44,3133.86 2523.62,3185.04 2700.79,3185.04 v1(2881.89,3366.14)
  MidLayer2 w5: v1(1838.58,1826.77) 1858.27,1846.46 1858.27,2027.56 1858.27,2039.37 1858.27,2122.05 1921.26,2185.04 2082.68,2185.04 2118.11,2220.47 2118.11,2263.78 2106.3,2275.59 2106.3,2291.34 2122.05,2307.09 2122.05,2645.67 2110.24,2657.48 2110.24,2673.23 2311.02,2874.02 2311.02,3082.68 2322.83,3094.49 2350.39,3094.49 2370.08,3114.18 v1(2409.45,3114.18)
  MidLayer3 w5: v2(2118.1,3850.39) 2118.11,3822.84 2397.64,3543.31 v1(2397.64,3500)
  MidLayer4 w5: v2(1362.2,3948.82) 1362.2,3885.83 1342.52,3866.14 1342.52,3842.52 1460.63,3724.41 2011.81,3724.41 2118.1,3830.7 v2(2118.1,3850.39) ; v1(2397.64,3500) 2397.64,3535.93 2440.45,3578.74 2854.33,3578.74 2866.14,3566.93 2866.14,3555.86 2889.76,3532.24 2889.76,3515.75 2881.89,3507.87 v1(2881.89,3366.14)
  Bottom Layer w5: U8.29@1362.2,3901.57 v2(1362.2,3948.82) ; U12.5@2870.08,3452.76 2870.08,3433.07 2881.89,3421.26 v1(2881.89,3366.14)
BUS_A7: U3.C3 U4.L22 U7.30 U8.30 U11.18 U12.18 | length 4903.8
  Top Layer w5: v2(2086.61,3826.77) U7.30@2086.61,3901.57 ; U11.18@2807.09,3452.76 2807.09,3496.06 2826.77,3515.75 2826.77,3527.56 v1(2846.46,3555.12)
  Top Layer w7.87: U4.L22@1858.27,1570.87 v1(1877.95,1590.55) ; U3.C3@2429.14,3095.48 v1(2448.82,3114.17)
  MidLayer2 w5: v1(1877.95,1590.55) 1897.64,1610.24 2078.74,1610.24 2090.55,1610.24 2110.24,1629.92 2110.24,1653.54 2377.95,1921.26 2377.95,2133.86 2456.69,2212.6 2456.69,2263.78 2468.5,2275.59 2468.5,2295.28 2456.69,2307.09 2456.69,2826.77 2507.87,2877.95 2507.87,3082.68 2496.06,3094.49 2468.5,3094.49 v1(2448.82,3114.17) ; v1(2688.98,3295.28) 2795.28,3401.57 2795.28,3484.25 2826.77,3515.75 2826.77,3535.43 v1(2846.46,3555.12)
  MidLayer3 w5: v2(2086.61,3826.77) 2086.61,3858.26 2098.43,3870.08 2125.98,3870.08 2137.8,3858.27 2137.8,3826.77 2409.45,3555.12 2409.45,3515.75 2460.63,3464.57 v2(2460.63,3401.57)
  MidLayer4 w5: v2(1393.7,3826.77) 1484.25,3736.22 1996.06,3736.22 v2(2086.61,3826.77) ; v2(2460.63,3401.57) 2519.68,3460.63 2771.65,3460.63 2826.77,3515.75 2826.77,3535.43 v1(2846.46,3555.12)
  Bottom Layer w5: v2(1393.7,3826.77) U8.30@1393.7,3901.57 ; v1(2448.82,3114.17) 2559.06,3224.41 2606.3,3224.41 2610.24,3228.35 2629.92,3248.03 2629.92,3263.78 2641.73,3275.59 2657.48,3275.59 2669.29,3287.4 2669.29,3291.34 2673.23,3295.28 v1(2688.98,3295.28) ; v2(2460.63,3401.57) U12.18@2460.63,3452.76 U12.18@2460.63,3472.44
BUS_A8: U3.A3 U4.M25 U7.31 U8.31 U11.19 U12.19 | length 4910.7
  Top Layer w5: U4.M25@1976.38,1531.5 1996.06,1551.18 2043.31,1551.18 2055.12,1539.37 2078.74,1539.37 2094.49,1539.37 2208.66,1539.37 2299.21,1629.92 2299.21,2007.87 2456.69,2165.35 2456.69,2263.78 2464.57,2271.65 2464.57,2602.36 2523.62,2661.42 2523.62,2814.96 2582.68,2874.02 2582.68,3019.68 v1(2527.56,3074.8) ; v2(2055.11,3850.39) U7.31@2055.12,3901.57 ; U11.19@2838.58,3452.76 2838.58,3472.44 2858.27,3492.13 2858.27,3511.81 v1(2870.08,3523.62)
  Top Layer w7.87: U3.A3@2507.88,3095.48 v1(2527.56,3074.8)
  MidLayer2 w5: v1(2688.98,3240.16) 2708.66,3240.16 2826.77,3358.27 2826.77,3366.14 2826.77,3437.01 2870.08,3480.31 v1(2870.08,3523.62)
  MidLayer3 w5: v2(2055.11,3850.39) 2055.11,3818.9 2080.55,3793.46 2123.86,3793.46 2370.08,3547.24 2385.83,3531.5 2385.83,3515.28 2385.36,3515.28 2377.95,3507.87 2377.95,3480.32 2429.13,3429.13 v1(2429.13,3377.95)
  MidLayer4 w5: v2(1425.2,3948.82) 1425.2,3885.83 1421.26,3881.89 1405.51,3866.14 1405.51,3842.52 1417.32,3830.71 1417.32,3822.83 1492.13,3748.03 1976.38,3748.03 2055.11,3826.77 v2(2055.11,3850.39) ; v1(2429.13,3377.95) 2448.82,3358.27 2511.81,3358.27 2594.49,3440.94 2811.02,3440.94 2858.27,3488.19 2858.27,3511.81 v1(2870.08,3523.62)
  Bottom Layer w5: U8.31@1425.2,3901.57 v2(1425.2,3948.82) ; v1(2429.13,3377.95) U12.19@2429.13,3452.76 ; v1(2527.56,3074.8) 2527.56,3094.49 2673.23,3240.16 v1(2688.98,3240.16)
BUS_A9: U3.B6 U4.M24 U7.32 U8.32 U11.20 U12.20 | length 5215.5
  Top Layer w5: v2(2023.62,3826.77) U7.32@2023.62,3901.57 ; U11.20@2870.08,3452.76 2870.08,3496.06 2901.57,3527.56 v1(2901.57,3562.99)
  Top Layer w7.87: U4.M24@1937.01,1531.5 v1(1956.69,1551.18) ; U3.B6@2468.5,2977.36 v1@2488.19,2957.68
  MidLayer1 w5: v1(1956.69,1551.18) 2078.74,1551.18 2090.55,1551.18 2188.98,1551.18 2216.54,1578.74 2216.54,1665.35 2299.21,1748.03 2299.21,2098.43 2457.07,2256.28 2457.07,2263.4 2456.69,2263.78 2468.5,2275.59 2468.5,2322.83 2519.68,2374.02 2519.68,2732.28 ; v1@2488.19,2957.68 2507.87,2938 2507.87,2937.01 2507.88,2889.75 2519.66,2877.98 2519.69,2708.66
  MidLayer3 w5: v2(2023.62,3826.77) 2066.93,3783.46 2102.36,3783.46 2122.05,3763.78 2346.46,3539.37 2346.46,3515.75 2366.14,3496.06 2366.14,3433.07 v2(2397.64,3401.57) ; v1(2822.83,3220.47) 2822.7,3238.32 2814.96,3246.06 2814.96,3277.56 2831.69,3294.29 2831.69,3343.5 2881.89,3393.7 2881.89,3507.87 2901.57,3527.56 ; 2901.57,3527.56 v1(2901.57,3562.99)
  MidLayer4 w5: v2(1456.69,3948.82) 1456.69,3854.33 1437.01,3834.65 1437.01,3818.9 1496.06,3759.84 1956.69,3759.84 v2(2023.62,3826.77) ; v2(2397.64,3401.57) 2397.64,3358.27 2429.13,3326.77 2877.95,3326.77 2905.51,3354.33 2905.51,3377.95 2893.7,3389.76 2893.7,3464.57 2921.26,3492.13 2921.26,3507.87 2913.39,3515.75 2913.39,3551.18 v1(2901.57,3562.99)
  Bottom Layer w5: U8.32@1456.69,3901.57 v2(1456.69,3948.82) ; v2(2397.64,3401.57) U12.20@2397.64,3452.76 ; v1(2488.19,2956.69) 2507.87,2976.38 2555.12,2976.38 2570.87,2992.13 2570.87,3055.12 2731.9,3216.15 2814.68,3216.65 v1@2822.84,3224.91
BUS_A10: U3.A6 U4.K26 U7.33 U8.33 U11.21 U12.21 | length 4806.5
  Top Layer w5: v2(1992.12,3850.39) U7.33@1992.13,3901.57 ; U4.K26@2015.75,1610.24 2078.74,1610.24 2094.49,1610.24 2216.54,1610.24 2263.78,1657.48 2263.78,2019.69 2370.08,2125.98 2370.08,2263.78 2362.2,2271.65 2362.2,2291.34 2429.13,2358.27 2429.13,2614.17 2456.69,2641.73 2456.69,2752.14 ; 2456.69,2740.16 2456.69,2795.27 2547.24,2885.83 2547.24,2937.01 v1(2527.56,2956.69) v1@2527.56,2957.68 ; U11.21@2901.57,3452.76 v1(2901.57,3500)
  Top Layer w7.87: U3.A6@2507.87,2977.36 v1@2527.56,2957.68
  MidLayer2 w5: v1(2835.63,3259.84) 2835.63,3284.45 2901.57,3350.39 2901.57,3381.89 2893.7,3389.76 2893.7,3468.5 2901.57,3476.38 v1(2901.57,3500)
  MidLayer3 w5: v2(1992.12,3850.39) 1992.12,3811.03 2031.5,3771.65 2098.43,3771.65 2322.83,3547.24 2322.83,3515.75 2314.96,3507.87 2314.96,3448.82 2366.14,3397.64 v1(2366.14,3377.95)
  MidLayer4 w5: v2(1488.19,3850.39) 1488.19,3814.96 1531.5,3771.65 1937.01,3771.65 1992.12,3826.77 v2(1992.12,3850.39) ; v1(2366.14,3377.95) 2366.14,3496.06 2385.36,3515.28 2385.83,3515.28 2385.83,3540.11 2436.27,3590.55 2862.2,3590.55 2877.95,3574.8 2877.95,3559.06 2901.57,3535.43 v1(2901.57,3500)
  Bottom Layer w5: v2(1488.19,3850.39) U8.33@1488.19,3901.57 ; v1(2366.14,3377.95) U12.21@2366.14,3452.76 ; v1(2527.56,2956.69) 2562.99,2956.69 2598.43,2992.13 2598.43,3066.93 2732.28,3200.79 2831.69,3200.79 2842.52,3211.61 2842.52,3232.29 2835.63,3239.17 v1(2835.63,3259.84) v1@2836.54,3258.79
BUS_A11: U3.C6 U4.L23 U7.34 U8.34 U11.22 U12.22 | length 5177.6
  Top Layer w5: v2(1960.62,3826.77) U7.34@1960.63,3901.57 ; U11.22@2933.07,3452.76 2933.07,3519.68 v1(2944.88,3531.5)
  Top Layer w7.87: U4.L23@1897.64,1570.87 v1(1917.32,1590.55) ; U3.C6@2429.13,2977.36 v1@2448.82,2957.68
  MidLayer1 w5: v1(1917.32,1590.55) 1937.01,1570.87 2078.74,1570.87 2090.55,1570.87 2192.91,1570.87 2204.72,1582.68 2204.72,1669.29 2287.4,1751.97 2287.4,2102.36 2433.07,2248.03 2433.07,2263.78 2421.26,2275.59 2421.26,2299.21 2507.87,2385.83 2507.87,2870.08 2468.51,2909.44 2468.51,2937.99 v1@2448.82,2957.68
  MidLayer2 w5: v1(2944.88,3531.5) 2944.88,3393.7 2956.69,3381.89 2956.69,3358.27 2952.76,3354.33 2937.01,3338.58 2937.01,3297.24 v1(2964.57,3269.68)
  MidLayer3 w5: v2(1960.62,3826.77) 2027.56,3759.84 2094.49,3759.84 2279.53,3574.8 2279.53,3519.68 2291.34,3507.87 2291.34,3444.88 v2(2334.65,3401.57)
  MidLayer4 w5: v2(1519.68,3948.82) 1519.68,3854.33 1500,3834.65 1500,3818.9 1535.43,3783.46 1917.32,3783.46 v2(1960.62,3826.77) ; v2(2334.65,3401.57) 2334.65,3472.44 2354.33,3492.13 2354.33,3507.87 2346.46,3515.75 2346.46,3531.5 2429.13,3614.17 2897.64,3614.17 2944.88,3566.93 v1(2944.88,3531.5) ; v1(2448.82,2956.69) 2468.5,2976.38 2649.61,2976.38 2858.27,3185.04 2909.45,3185.04 2964.57,3240.16 2964.57,3266.73 v1@2961.61,3269.68
  Bottom Layer w5: U8.34@1519.68,3901.57 v2(1519.68,3948.82) ; v2(2334.65,3401.57) U12.22@2334.65,3452.76
BUS_A12: U3.D6 U4.K24 U7.22 U8.22 U11.23 U12.23 | length 5532.1
  Top Layer w5: U7.22@1992.13,3452.76 v2(1992.12,3527.55) ; v2(2933.07,3850.39) U11.23@2933.07,3901.57
  Top Layer w7.87: U4.K24@1937.01,1610.24 v1(1956.69,1629.92) ; U3.D6@2389.76,2977.36 v1@2409.45,2957.68
  MidLayer1 w5: v1(1956.69,1629.92) 2051.18,1629.92 2078.74,1629.92 2094.49,1629.92 2114.17,1649.61 2145.67,1681.1 2200.79,1681.1 2259.84,1740.16 ; 2204.72,1685.04 2275.59,1755.91 2275.59,2106.3 2393.7,2224.41 2393.7,2263.78 2405.51,2275.59 2405.51,2303.15 2417.32,2314.96 2417.32,2665.35 2433.07,2681.1 2433.07,2696.85 2393.7,2736.22 2393.7,2874.02 2429.14,2909.46 2429.14,2937 v1(2409.45,2956.69) 2409.45,2957.68 v1@2409.94,2957.19
  MidLayer2 w5: v2(1992.12,3527.55) 2023.62,3559.06 2141.73,3559.06 2314.96,3732.28 2314.96,3834.64 2326.77,3846.46 v2(2326.77,3952.76) ; v2(2933.07,3850.39) 2933.07,3610.24 3043.31,3500 3043.31,3240.16 v1(2988.19,3185.04)
  MidLayer4 w5: v2(1488.19,3503.94) 1488.19,3539.37 1531.5,3582.68 1937,3582.68 v2(1992.12,3527.55) ; v2(2326.77,3952.76) 2326.77,3933.07 2334.65,3925.2 2334.65,3854.33 2354.33,3834.65 2354.33,3811.02 2370.08,3795.28 2913.39,3795.28 2933.07,3814.96 v2(2933.07,3850.39) ; v1(2409.45,2956.69) 2429.13,2937.01 2740.16,2937.01 2800,2996.85 2800,3060 2830,3090 2950,3090 2988.19,3128.19 v1(2988.19,3185.04)
  Bottom Layer w5: U8.22@1488.19,3452.76 v2(1488.19,3503.94) ; v2(2326.77,3952.76) 2326.77,3929.13 2334.65,3921.26 U12.23@2334.65,3901.57
BUS_A13: U3.B7 U4.J25 U7.35 U8.35 U11.24 U12.24 | length 5076
  Top Layer w5: v2(1929.13,3850.39) U7.35@1929.13,3901.57 ; U4.J25@1976.38,1649.61 1996.06,1669.29 2078.74,1669.29 2094.49,1669.29 2185.04,1669.29 2240.16,1724.41 2240.16,2027.56 2307.09,2094.49 2307.09,2263.78 2299.21,2271.65 2299.21,2290.85 2405.51,2397.14 2405.51,2622.05 2433.07,2649.61 2433.07,2756.79 ; 2433.07,2740.16 2433.07,2807.09 2488.19,2862.21 2488.19,2918.31 U3.B7@2468.5,2937.99 ; v2(2901.57,3826.77) U11.24@2901.57,3901.57
  MidLayer1 w5: v2(1929.13,3850.39) 1929.13,3913.39 2011.81,3996.06 2322.83,3996.06 v2(2366.14,3952.76)
  MidLayer2 w5: v2(2901.57,3826.77) 2913.39,3814.96 2913.39,3606.3 3031.5,3488.19 3031.5,3259.84 v1(2956.69,3185.04)
  MidLayer4 w5: v2(1551.18,3948.82) 1551.18,3881.89 1531.5,3862.2 1531.5,3842.52 1578.74,3795.28 1897.64,3795.28 1929.13,3826.77 v2(1929.13,3850.39) ; v2(2366.14,3952.76) 2421.26,4007.87 2834.65,4007.87 2858.27,3984.25 2858.27,3968.5 2850.39,3960.63 2850.39,3905.51 2889.76,3866.14 2889.76,3838.58 v2(2901.57,3826.77)
  Bottom Layer w5: U8.35@1551.18,3881.89 U8.35@1551.18,3901.57 v2(1551.18,3948.82) ; U12.24@2366.14,3901.57 v2(2366.14,3952.76) ; v1(2488.19,2917.32) 2507.87,2897.64 2559.06,2897.64 2696.85,3035.43 2815.43,3035.43 2870,3090 2930,3090 2956.69,3116.69 v1(2956.69,3185.04)
BUS_A14: U3.A7 U4.K25 U7.36 U8.36 U11.25 U12.25 | length 4886.2
  Top Layer w5: v2(1897.63,3826.77) U7.36@1897.64,3901.57 ; U4.K25@1976.38,1610.24 1996.06,1629.92 2051.18,1629.92 2062.99,1641.73 2078.74,1641.73 2094.49,1641.73 2102.12,1649.36 2180.86,1649.36 2251.97,1720.47 2251.97,2023.62 2330.71,2102.36 2330.71,2263.78 2338.58,2271.65 2338.58,2299.21 2417.32,2377.95 2417.32,2618.11 2444.88,2645.67 2444.88,2754.47 ; 2444.88,2744.09 2444.88,2799.21 2527.56,2881.89 v1@2527.56,2918.31 ; v2(2870.08,3850.39) U11.25@2870.08,3901.57
  Top Layer w7.87: U3.A7@2507.87,2937.99 v1@2527.56,2918.31
  MidLayer1 w5: v2(1897.63,3826.77) 1897.64,3921.26 1917.32,3940.94 1917.32,3956.69 1909.45,3964.57 1909.45,3980.32 1921.26,3992.13 1988.19,3992.13 2003.94,4007.87 2342.52,4007.87 v2(2397.64,3952.76)
  MidLayer3 w5: v2(2870.08,3850.39) 2881.89,3838.58 2881.89,3814.96 2921.26,3775.59 2921.26,3555.12 2913.39,3547.24 2913.39,3515.75 2921.26,3507.87 2921.26,3444.88 2893.7,3417.32 2893.7,3389.76 2901.57,3381.89 2901.57,3354.33 2873.03,3325.79 2873.03,3313.98 2882.87,3304.13 2906.5,3304.13 2934.06,3276.57 v1(2934.06,3166.34)
  MidLayer4 w5: v2(1582.68,3830.71) 1606.3,3807.09 1877.95,3807.09 v2(1897.63,3826.77) ; v2(2397.64,3952.76) 2440.94,3996.06 2791.34,3996.06 2838.58,3948.82 2838.58,3881.89 v2(2870.08,3850.39)
  Bottom Layer w5: v2(1582.68,3830.71) U8.36@1582.68,3901.57 ; U12.25@2397.64,3901.57 v2(2397.64,3952.76) ; v1(2527.56,2917.32) 2551.18,2917.32 2616.5,2982.65 2616.5,3069.26 2736.22,3188.98 2911.42,3188.98 v1(2934.06,3166.34)